# Altium PCB OOZE270323.PcbDoc
Units mil, origin at the board's own origin, x right, y up, seen from the top; angles counter-clockwise.
Board outline 3937.01 x 3937.01 mil, 2 copper layers (Top Layer, Bottom Layer); 41 components, 44 nets, 181 pads, 26 vias.
Unrouted connection lines stored in the file: 13.
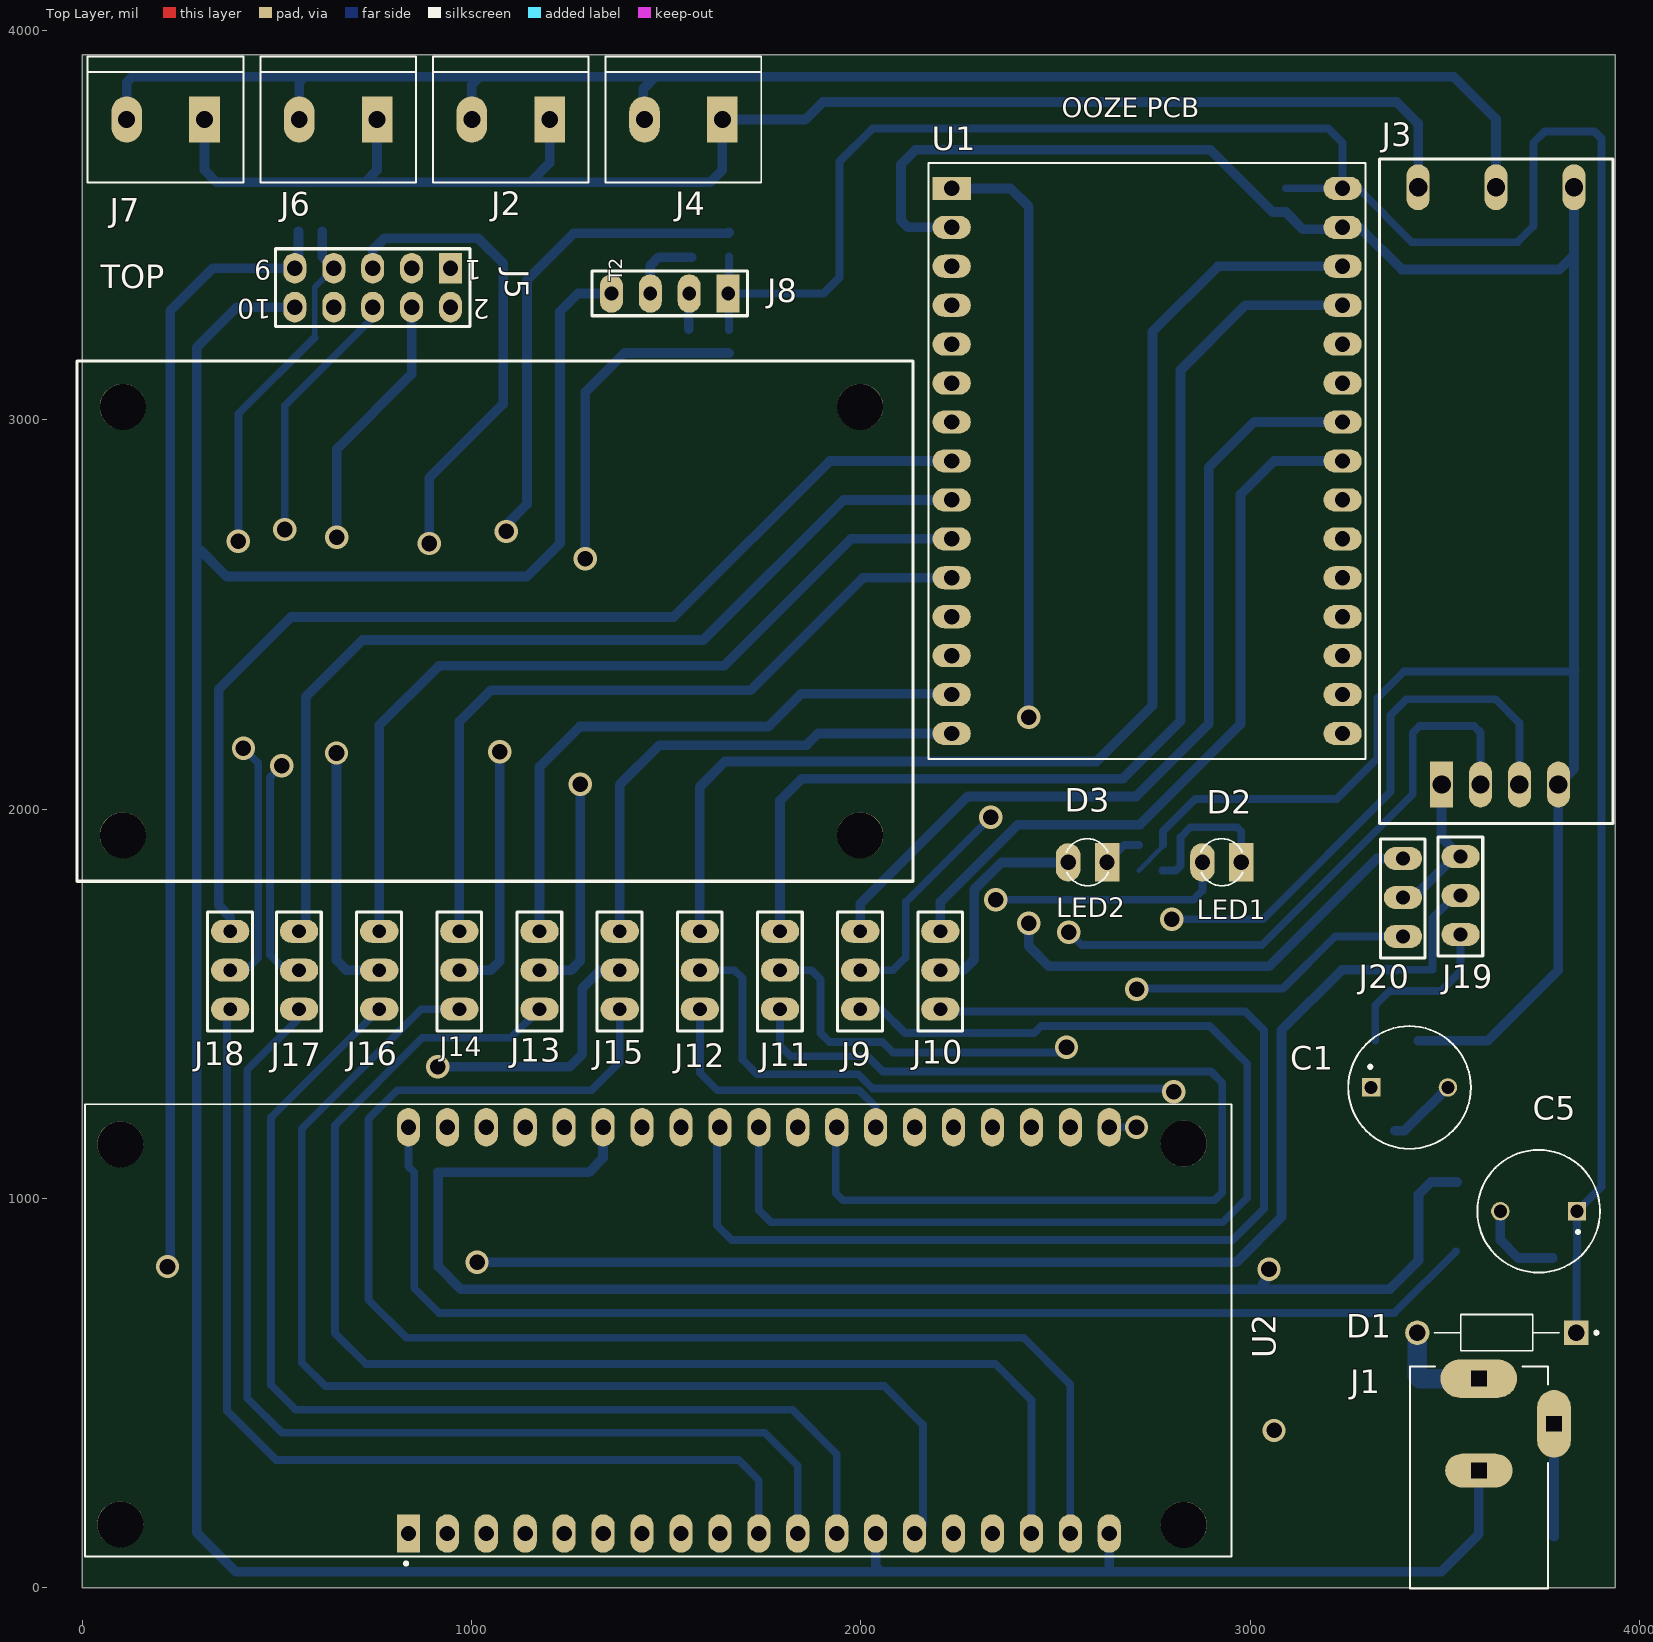
[diagram p0: Top Layer view]
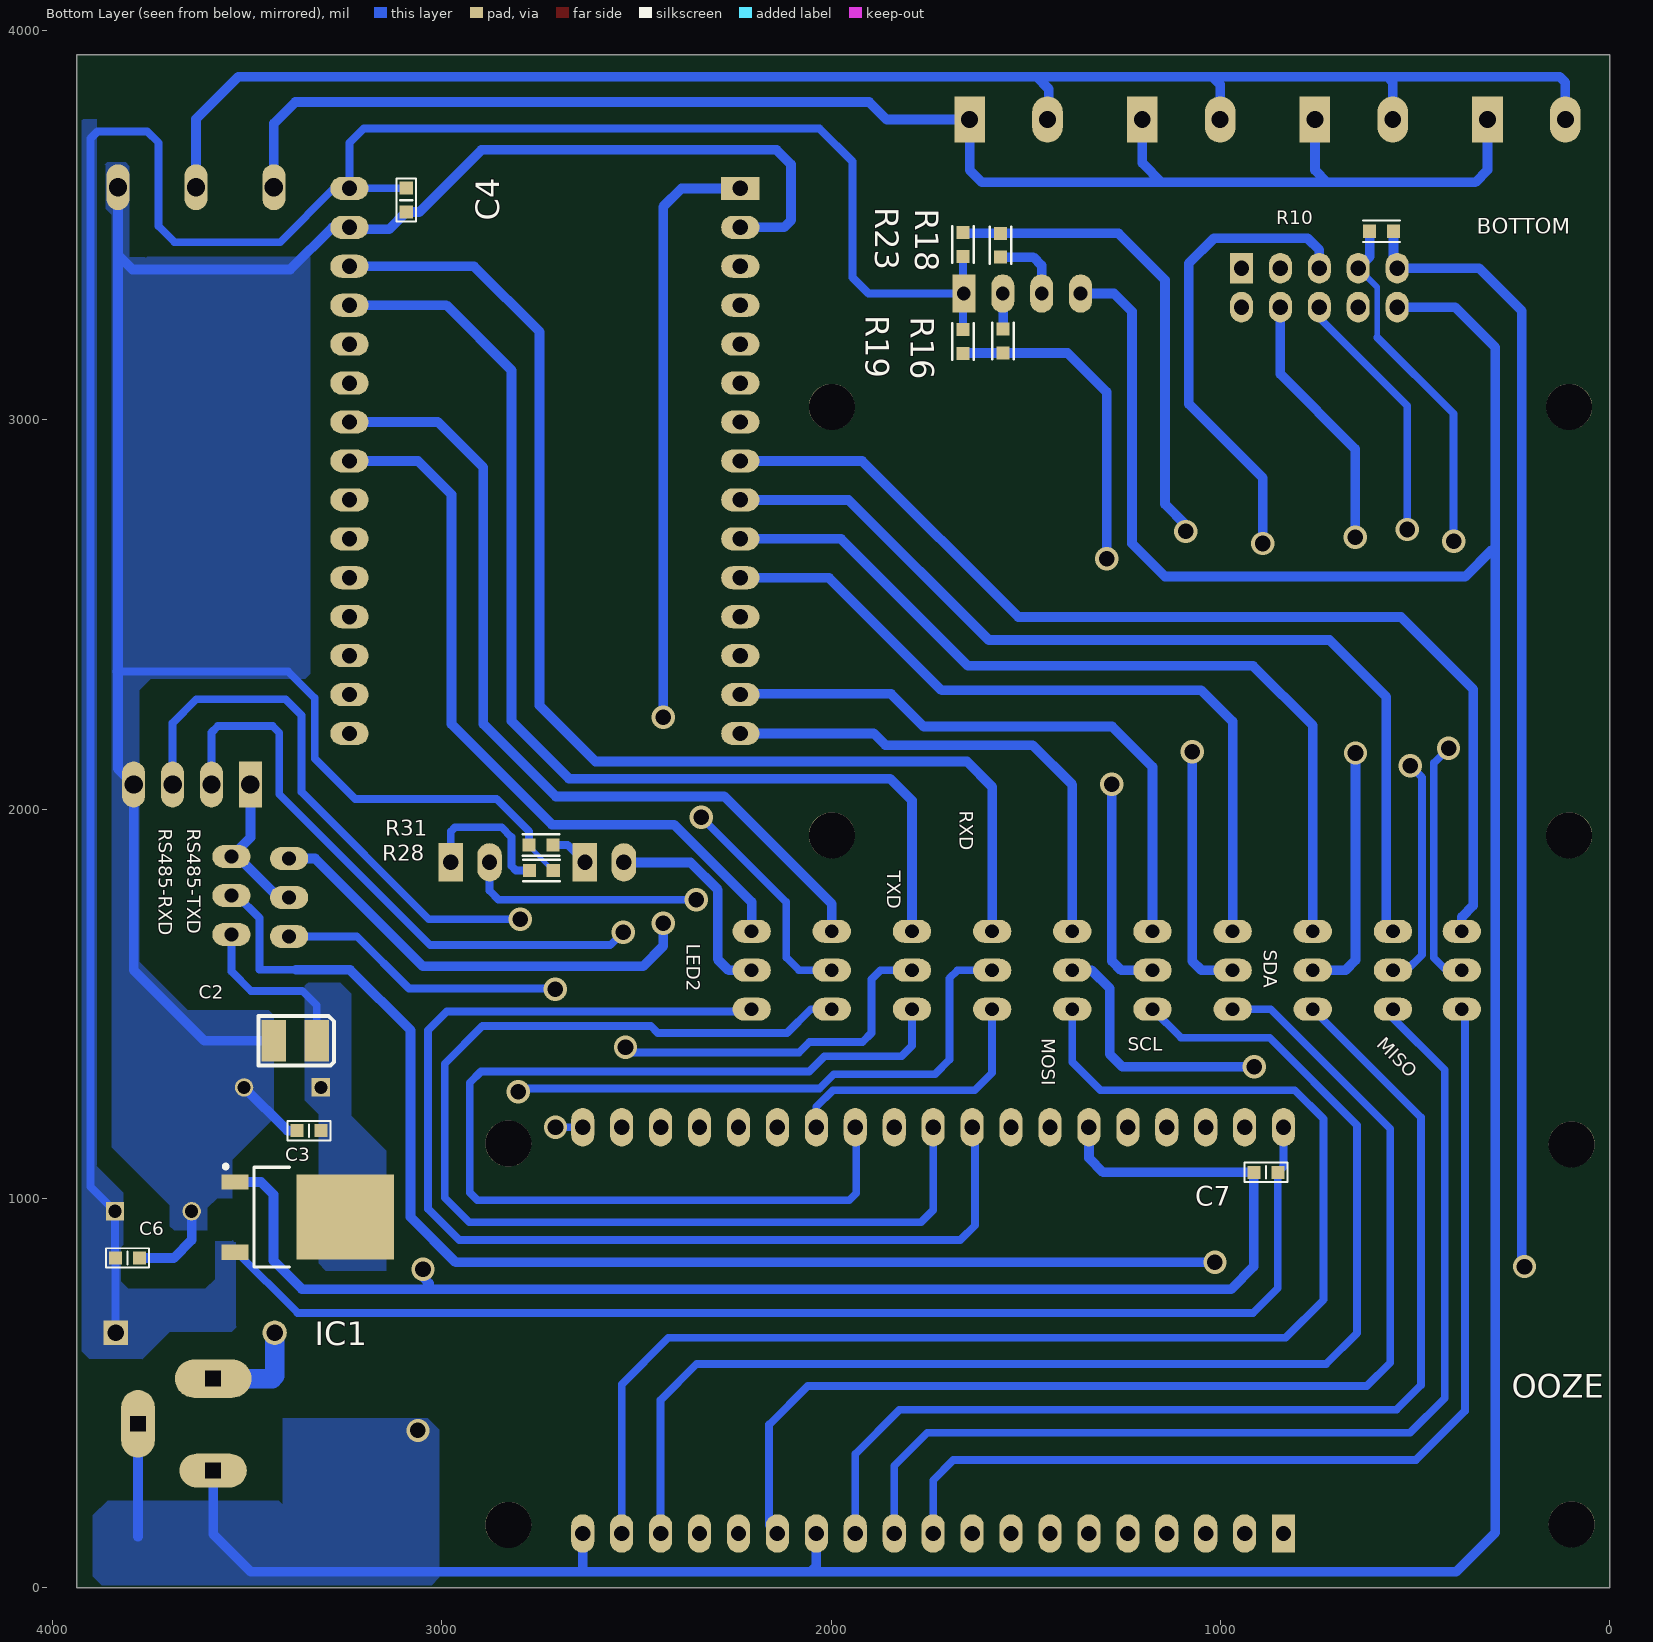
[diagram p1: Bottom Layer view, seen from below]
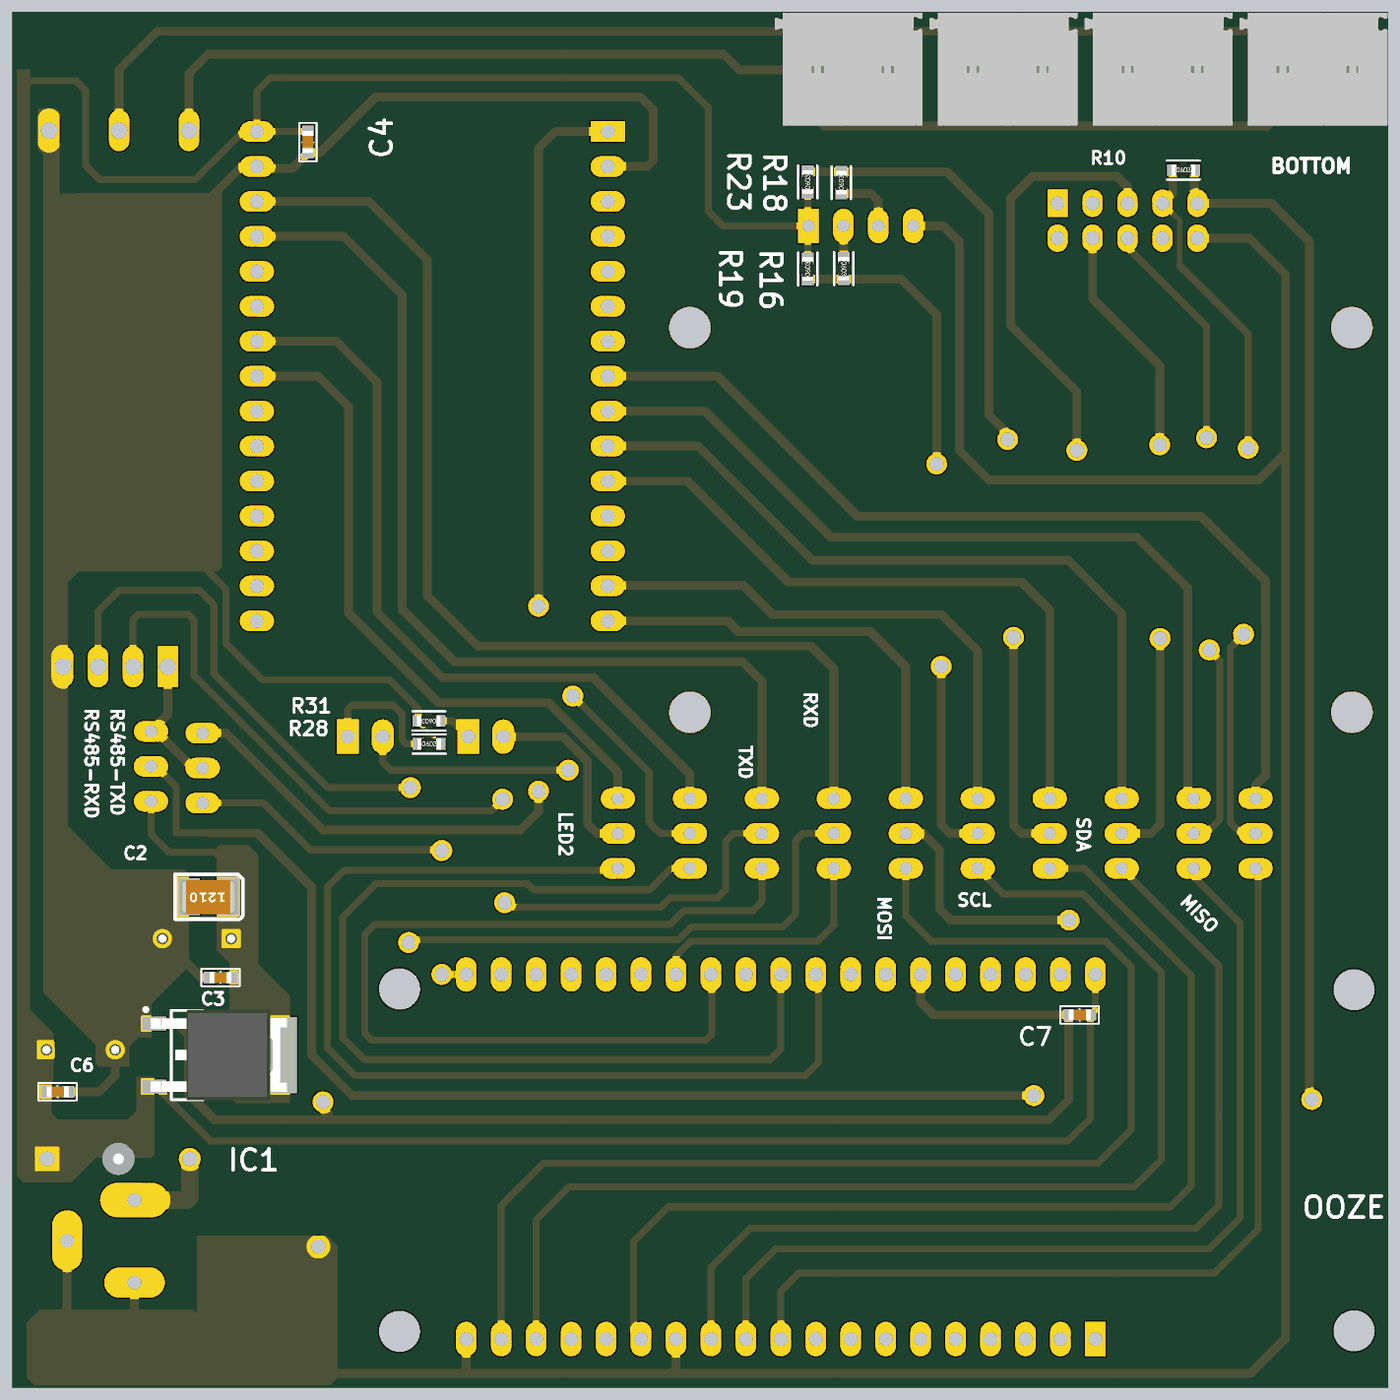
[diagram p2: 3D render of the assembled board from below, using the file's embedded part models]

## Layer stack, top to bottom
Top Solder: solder mask 0.4, Solder Resist, Dk 3.5
Top Layer: signal copper 1.4
Dielectric 1: core 12.6, FR-4, Dk 4.8
Bottom Layer: signal copper 1.4
Bottom Solder: solder mask 0.4, Solder Resist, Dk 3.5

## Board outline
0,0 3937.01,0 3937.01,3937.01 0,3937.01

## Design rules (kind name [scope] priority, off if disabled: settings)
Clearance [All] p1: gap=6 ignorepadtopadclearanceinfootprint=FALSE except(10: Fill-Fill Fill-Poly Fill-Region Poly-Poly Poly-Region Region-Region; 20: Arc-Fill Arc-Poly Arc-Region Track-Fill Track-Poly Track-Region SMDPad-Fill SMDPad-Poly SMDPad-Region Fill-Hole Poly-Hole Region-Hole)
HoleToHoleClearance [All] p1: gap=5 allowstackedmicrovias=TRUE
MinimumSolderMaskSliver [All] p1: minsoldermaskwidth=5
PlaneClearance [All] p1: clearance=200
PlaneConnect [All] p1: planeconnectstyle=Direct reliefexpansion=20 reliefentries=4 reliefconductorwidth=10 reliefairgap=80
PolygonConnect [All] p1: connectstyle=Direct reliefconductorwidth=30 reliefentries=4 polygonreliefangle="90 Angle" airgapwidth=78.74
RoutingVias [All] p1: holewidth=28 width=13 viastyle="Through Hole" minholewidth=20 minwidth=10 maxholewidth=24 maxwidth=13
SilkToSilkClearance [All] p1: silktosilkclearance=5
SilkToSolderMaskClearance [IsPad] p1: minsilkscreentomaskgap=5 clearancetoexposedcopper=TRUE
SolderMaskExpansion [All] p1: expansion=4
Width [All] p1: maxlimit=70 minlimit=6 preferedwidth=10
24 further rules are at their usual default settings.

## Components (designator, comment, footprint, x,y, rotation, side; value= is the part's Value field where it differs from the comment)
C1 "470uF/25V" CAP_through_hole_470mfd 3409,1285 r0 top
C2 "100uF/Tan" Tantalum-1210C 3376,1405 r0 bottom
C3 "100nF" SMD-0603C 3341,1174 r270 bottom
C4 "100nF" SMD-0603C 3091,3564 r180 bottom
C5 "470uF/25V" CAP_through_hole_470mfd 3740.57,967 r180 top
C6 "100nF" SMD-0603C 3807,847 r90 bottom
C7 "100nF" SMD-0603C 883,1067 r270 bottom
D1 "1n5819" "IN5819 SCHOTTKY DIODE" 3632.94,655 r180 top
D2 "LED" "3mm Led1 - single Side" 2977,1863 r180 top
D3 "LED" "3mm Led1 - single Side" 2632,1863 r180 top
IC1 "LM1117DT_3_3_NOPB" LM1117DT_3_3_NOPB 3346,952 r180 bottom
J1 "DC Socket" "DC Socket" 3587,301 r90 top
J2 "5mm TB1" "2PIN TB-Single Side" 1100.66,3771 r180 top
J3 "TTL to RS485" "RS485-TTL Module" 3491.24,1963.14 r0 top
J4 "5mm TB2" "2PIN TB-Single Side" 1544,3771 r180 top
J5 "5x2 Header" HDR2X5 946,3389 r180 top
J6 "5mm TB3" "2PIN TB-Single Side" 657.33,3771 r180 top
J7 "5mm TB4" "2PIN TB-Single Side" 214,3771 r180 top
J8 "JHD-2X16-I2C" "4 pin connector-Single Side" 1659,3324 r180 top
J9 "Header 3" "3 pin connector - Sinle Side" 1998.1,1686 r270 top
J10 "Header 3" "3 pin connector - Sinle Side" 2204,1686 r270 top
J11 "Header 3" "3 pin connector - Sinle Side" 1792.2,1686 r270 top
J12 "Header 3" "3 pin connector - Sinle Side" 1586.3,1686 r270 top
J13 "Header 3" "3 pin connector - Sinle Side" 1174.5,1686 r270 top
J14 "Header 3" "3 pin connector - Sinle Side" 968.6,1686 r270 top
J15 "Header 3" "3 pin connector - Sinle Side" 1380.4,1686 r270 top
J16 "Header 3" "3 pin connector - Sinle Side" 762.7,1686 r270 top
J17 "Header 3" "3 pin connector - Sinle Side" 556.8,1686 r270 top
J18 "Header 3" "3 pin connector - Sinle Side" 379.9,1686 r270 top
J19 "Header 3" "3 pin connector - Sinle Side" 3540,1878 r270 top
J20 "Header 3" "3 pin connector - Sinle Side" 3392,1873 r270 top
R10 "4.7K" SMD-0603-RES 586,3484 r270 bottom
R16 "100E" SMD-0603-RES 1558,3202 r0 bottom
R18 "100E" SMD-0603-RES 1565,3448 r180 bottom
R19 "4.7K" SMD-0603-RES 1661,3201 r180 bottom
R23 "4.7K" SMD-0603-RES 1661,3450 r180 bottom
R28 "1K" SMD-0603-RES 2744,1842 r270 bottom
R31 "1K" SMD-0603-RES 2745,1908 r90 bottom
U1 "ESP32DEVKITV1" "ESP32DEVKITV1- single side" 2233,3594 r0 top
U2 "TTGO_SIM800L" "TTGO_SIM800L-Single Side" 837.76,139.39 r270 top
? "Comment" "Ethernet Module Mounting" 2033.43,2283 r90 top

## Footprints (in the part's own frame and the unit in brackets; to place one, negate y for a bottom-side part, rotate by r counter-clockwise, add the part's x,y. Pads: shape width x height; smd on the part's side, far side on the other; paste and mask are expansions set on the pad)
"2PIN TB-Single Side" [mm]
  rect 2x3 hole 1.1: 1(-2.54,0)
  oval 2x3 hole 1.1: 2(2.54,0)
  silkscreen extent -5.08,-4.1 5.08,4.1, body extent -5.38,-4.14 5.38,4.06, height 8.25
"3 pin connector - Sinle Side" [mm]
  oval 1.5x2.5 hole 0.9: 1(0,0) 2(2.54,0) 3(5.08,0)
  silkscreen extent -1.27,-1.47 6.5,1.45
"3mm Led1 - single Side" [mm]
  rect 1.6x2.5 hole 1: 1(0,0)
  oval 1.6x2.5 hole 1: 2(2.54,0)
  silkscreen extent -0.07,-1.54 2.63,1.52
"4 pin connector-Single Side" [mm]
  rect 1.5x2.5 hole 0.9: 1(0,0)
  oval 1.5x2.5 hole 0.9: 2(2.54,0) 3(5.08,0) 4(7.62,0)
  silkscreen extent -1.27,-1.47 8.89,1.45
CAP_through_hole_470mfd [mm]
  rect 1.2x1.2 hole 0.85: 1(-2.5,0)
  round 1.2 hole 0.85: 2(2.5,0)
  silkscreen extent -4,-4 4,4, body extent -4,-4 4,4, height 11.5
"DC Socket" [mm]
  oval 4.4x2.2 hole 1 square: 1(3.05,-4.9)
  oval 2.2x4.4 hole 1 square: 2(0,0)
  oval 2.5x5 hole 1 square: 3(6,0)
  silkscreen extent -7.7,-4.5 6.8,4.5
"ESP32DEVKITV1- single side" [mm]
  rect 2.5x1.508 hole 1: 1(0,0)
  oval 2.5x1.508 hole 1: 2(0,-2.54) 3(0,-5.08) 4(0,-7.62) 5(0,-10.16) 6(0,-12.7) 7(0,-15.24) 8(0,-17.78) 9(0,-20.32) 10(0,-22.86) 11(0,-25.4) 12(0,-27.94) 13(0,-30.48) 14(0,-33.02) 15(0,-35.56) 16(25.5,-35.56) 17(25.5,-33.02) 19(25.5,-27.94) 20(25.5,-25.4) 21(25.5,-22.86) 22(25.5,-20.32) 23(25.5,-17.78) 24(25.5,-15.24) 25(25.5,-12.7) 26(25.5,-10.16) 27(25.5,-7.62) 28(25.5,-5.08) 29(25.5,-2.54) 30(25.5,0)
  oval 2.5x1.508 hole 1 mask+0.102: 18(25.5,-30.48)
  silkscreen extent -1.5,-37.23 27,1.67
"Ethernet Module Mounting" [mm]
  round 3 hole 3: MH(-8.9,49) MH(-8.9,0.9) MH(19.05,49) MH(19.05,0.9)
  silkscreen extent -11.9,-2.54 22.05,52
HDR2X5 [mm] "Connector; Header; 5x2 Position"
  rect 1.5x2 hole 1: 1(0,0)
  oval 1.5x2 hole 1: 2(0,2.54) 3(2.54,0) 4(2.54,2.54) 5(5.08,0) 6(5.08,2.54) 7(7.62,0) 8(7.62,2.54) 9(10.16,0) 10(10.16,2.54)
  silkscreen extent -1.27,-1.27 11.43,3.81
"IN5819 SCHOTTKY DIODE" [mm]
  round 1.59 hole 1.06: A(5.18,0)
  rect 1.59x1.59 hole 1.06: C(-5.18,0)
  silkscreen extent -6.6,-1.17 4.07,1.17, body extent -1.17,-1.17 1.17,1.17, height 27.72
LM1117DT_3_3_NOPB [mm]
  rect 1.75x1 smd: 1(-4.7,2.285) 3(-4.7,-2.285)
  rect 6.35x5.55 smd: 4(2.5,0)
  silkscreen extent -5.43,-3.25 -1.15,3.42, body extent -4.95,-3.29 4.95,3.29, height 2.47
"RS485-TTL Module" [mm]
  rect 1.5x3 hole 1.2: 1(0,2.54)
  oval 1.5x3 hole 1.2: 2(2.54,2.54) 3(5.08,2.54) 4(7.62,2.54) 5(-1.53,41.5) 6(3.55,41.5) 7(8.64,41.5)
  silkscreen extent -4.05,0 11.18,43.33
SMD-0603-RES [mm]
  rect 0.85x0.85 smd: 1(0,0.775) 2(0,-0.775)
  silkscreen extent -0.7,-1.2 0.7,1.2, body extent -0.4,-0.85 0.4,0.85, height 0.56
SMD-0603C [mm]
  rect 0.85x0.85 smd: 1(0,0.775) 2(0,-0.775)
  silkscreen extent -0.64,-1.4 0.64,1.4, body extent -0.4,-0.8 0.4,0.8, height 0.9
Tantalum-1210C [mm]
  rect 1.6x2.7 smd: 1(-1.4,0) 2(1.4,0)
  silkscreen extent -2.51,-1.63 2.41,1.63, body extent -2,-1.22 2,1.27, height 1.7
"TTGO_SIM800L-Single Side" [mm]
  rect 2.508x1.508 hole 1: 1(0,0)
  oval 2.508x1.508 hole 1: 2(0,2.54) 3(0,5.08) 4(0,7.62) 5(0,10.16) 6(0,12.7) 7(0,15.24) 8(0,17.78) 9(0,20.32) 10(0,22.86) 11(0,25.4) 12(0,27.94) 13(0,30.48) 14(0,33.02) 15(0,35.56) 16(0,38.1) 17(0,40.64) 18(0,43.18) 19(0,45.72) 20(-26.5,45.72) 21(-26.5,43.18) 22(-26.5,40.64) 23(-26.5,38.1) 24(-26.5,35.56) 25(-26.5,33.02) 26(-26.5,30.48) 27(-26.5,27.94) 28(-26.5,25.4) 29(-26.5,22.86) 30(-26.5,20.32) 31(-26.5,17.78) 32(-26.5,15.24) 33(-26.5,12.7) 34(-26.5,10.16) 35(-26.5,7.62) 36(-26.5,5.08) 37(-26.5,2.54) 38(-26.5,0)
  round 3 hole 3 unplated: ""(-25.44,50.57) ""(-25.39,-18.79) ""(-0.6,-18.79) ""(-0.56,50.57)
  silkscreen extent -28,-21.09 2.06,53.69

## Part data
C1 C2 C5: library part CAP
C3 C4 C6 C7: library part "CAP NP"
D1: library part "DIODE SCHOTTKY"
IC1: "Space saving 800-mA low-dropout linear regulator with internal current limit", DevicesInPackage=1, Manufacturer_Name="Texas Instruments", Manufacturer_Part_Number=LM1117DT-3.3/NOPB, Mouser Part Number=926-LM1117DT-3.3NOPB, Datasheet Link=https://datasheet.datasheetarchive.com/originals/distributors/Datasheets-SFU2/DSASFU100036103.pdf, DeviceDesignator=A, DeviceNumbering=Alpha, DevicesInView=1, Height="2.38 mm", IsHeterogeneous=False, OriginalSymbolOrigin=(0,0), PackageName=LM1117DT_3_3_NOPB
J1: library part CON3
J2 J4 J6 J7: library part CON2
J3: library part CON7
J5: library part CON10AP_0
J8: library part CON4
J9 J10 J11 J12 J13 J14 J15 J16 J17 J18 J19 J20: "Header, 3-Pin", LatestRevisionDate=17-Jul-2002, LatestRevisionNote="Re-released for DXP Platform.", Publisher="Altium Limited"
R10 R16 R18 R19 R23 R28 R31: library part RESISTOR

## Via types
v1: diameter 60, hole 40, Top Layer to Bottom Layer, 26 vias

## Nets (pads, with @x,y where several pads share a name; then routed paths per layer and width w, separated by ;. In a path a pad name is that pad's centre, name@x,y a point inside that pad or via, vN(x,y) a via of type N, cw(c..) or ccw(c..) an arc to the next point about the centre after c; other vN are vias at no path point)
+3.3V1: J20.1 U1.1 | length 2684.7
  Bottom Layer w25: U1.1 2384,3594 2431,3547 v1(2431,2236) ; v1(2431,1707) 2431,1648 2483,1596 3048,1596 3325,1873 J20.1
+3.3V2: J20.3 U2.20 | length 805.4
  Bottom Layer w20: U2.20 v1(2707.7,1182.7) ; v1@2712,1539 3084,1539 3218,1673 J20.3
  other v1: 2708,1537
+3.3V_ETH: J5.9 J19.2 R10.1 | length 6196.7
  Bottom Layer w20: 3374,1587 3468,1587 3468,1720 3526,1778 J19.2
  Bottom Layer w25: v1(219,825) 226,832 226,3279 336,3389 J5.9 555.49,3398.49 R10.1 ; v1(1014,836) 2964,836 3080,952 3080,1432 3235,1587 3374,1587
+3.3V_EXT: C1.1 C2.1 C3.1 IC1.4 J19.3 | length 441.1
  Bottom Layer w20: C2.1 3320.88,1495.88 3358,1533 3490,1533 3540,1583 J19.3
+3.3VDC: J3.1 J19.1 J20.2 | length 396.8
  Bottom Layer w25: J20.2 3419,1773 3524,1878 J19.1 3491.24,1926.76 J3.1
A+: J2.1 J3.5 J4.1 J6.1 J7.1 | length 3964.8
  Bottom Layer w25: J7.1 314,3641 345.42,3609.58 726,3609.58 ; J6.1 757.33,3640.91 726,3609.58 ; J2.1 1200.66,3659.25 1151,3609.58 ; J3.5 3431,3761 3376,3816 1902,3816 1857,3771 J4.1 1644,3641 1612.58,3609.58 1151,3609.58 ; 726,3609.58 1151,3609.58
B-: J2.2 J3.6 J4.2 J6.2 J7.2 | length 4195.3
  Bottom Layer w25: J7.2 114,3866 129,3881 571,3881 ; J6.2 557.33,3867.33 571,3881 ; J2.2 1000.66,3860.66 1021,3881 ; J4.2@1441,3771 1441,3850 1472,3881 ; J3.6 3631,3772 3522,3881 1472,3881 ; 571,3881 1021,3881 ; 1021,3881 1472,3881
CS: J5.7 J18.2 R10.2 | length 1548.8
  Bottom Layer w15: 597,3211 597,3340 J5.7
  Bottom Layer w20: J18.2 420,1586 452,1618 452,2118 v1(414,2156) ; v1(401,2688) 401,3015 597,3211
  Bottom Layer w25: R10.2 616.51,3418.49 J5.7
CS1: J18.1 U1.8 | length 2747
  Bottom Layer w25: J18.1 379.9,1723.1 350.9,1752.1 350.9,2307.9 536,2493 1519,2493 1920,2894 U1.8@2212,2894 ; U1.8@2215.5,2890.5 U1.8@2222,2897
CS2: J18.3 U2.10 | length 2611.5
  Bottom Layer w20: J18.3 372,1478.1 372,454 498,328 1686,328 1737.76,276.24 U2.10
GND: C1.2 C2.2 C3.2 C4.2 C5.2 C6.2 C7.2 IC1.1 J1.1 J1.2 J3.4 J3.7 J5.10 J8.4 R28.1 R31.1 U1.2 U1.29 U2.13 U2.19 U2.33 | length 19345.1
  Bottom Layer w12: R28.1 2775.51,1904.02 R31.1
  Bottom Layer w20: R31.1 2775.51,1942.51 2859,2026 3222,2026 3326,2130 3326,2285 3394,2353 3831.39,2353 3835,2353
  Bottom Layer w25: 302,2666 371,2597 1142,2597 1227,2682 1227,3278 1273,3324 J8.4 ; J5.10 397,3289 294,3186 294,142 395,41 2053,41 ; C7.2 1301,1067 1337.76,1103.76 U2.33 ; C7.2@914.49,1067 914.49,824.51 972,767 3359,767 3432,840 3432,1010 3463.96,1041.96 IC1.1 ; U2.13 2037.76,56.24 2053,41 ; U1.2 2121,3494 2103,3512 2103,3656 2140,3693 2898,3693 3057.51,3533.49 C4.2 3135.49,3489 3231.94,3489 U1.29 3281,3494 3389,3386 3794,3386 3831.39,3423.39 ; U2.19 2637.76,43.76 2635,41 ; 3032,782 3048,798 v1(3048,818) ; C3.2 3396.43,1174 C1.2 ; C2.2 3610,1405 3791.24,1586.24 J3.4 3831.39,2103.3 3831.39,2353 3831.39,3423.39 ; J1.2 3587,138 3490,41 2635,41 ; C5.2 3642.15,892.85 3688,847 C6.2 ; J1.1@3770.91,376.53 J1.1@3770.91,467.08 ; 3779.91,131.09 J1.1 ; J3.7 3831.39,3423.39 ; 2053,41 2635,41
  other v1: 3061,404
LED1: D2.2 J9.2 | length 1194.4
  Bottom Layer w20: J9.2 2082,1586 2115,1619 2115,1761 v1(2333,1979) ; v1(2346,1767) 2854,1767 2877,1790 D2.2
LED1_1: J9.1 U1.24 | length 2186.7
  Bottom Layer w25: J9.1 1998.1,1756.1 2274,2032 2707,2032 2893,2218 2893,2877 3010,2994 U1.24@3215.94,2994
LED1_2: J10.1 U1.23 | length 1901.9
  Bottom Layer w25: J10.1 2204,1761 2403,1960 2717,1960 2975,2218 2975,2808 3061,2894 U1.23@3215.94,2894
LED2: D3.2 J10.2 | length 547.6
  Bottom Layer w25: J10.2 2263,1586 2291,1614 2291,1793 2361,1863 D3.2
LED2_1: J9.3 U2.29 | length 2916.5
  Bottom Layer w20: U2.29 1737.76,970.24 1769,939 2929,939 2992,1002 2992,1346 2895,1443 2463,1443 2445,1425 2113,1425 2052,1486 J9.3
LED2_2: J10.3 U2.30 | length 3021.2
  Bottom Layer w20: U2.30 1630,1174.94 1630,931 1668,893 2955,893 3035,973 3035,1432 2987,1480 2210,1480 J10.3
MISO: J5.4 J16.2 | length 1323
  Bottom Layer w25: v1(653,2144) 653,1612 679,1586 J16.2 ; v1(654,2698) 654,2925 846,3117 J5.4
MISO1: J16.1 U1.10 | length 2176.5
  Bottom Layer w25: J16.1 762.7,2214.7 916,2368 1648,2368 1974,2694 U1.10@2212,2694
MISO2: J16.3 U2.12 | length 2810.9
  Bottom Layer w20: J16.3 485,1208.3 485,520 548,457 1824,457 1937.76,343.24 U2.12
MOSI: J5.5 J15.2 | length 1888.8
  Bottom Layer w25: J5.5 746,3436 776,3466 1017,3466 1081,3402 1081,3040 891,2850 v1(891,2682) ; v1(913,1338) 1252,1338 1284,1370 1284,1539 1331,1586 J15.2
MOSI1: J15.1 U1.15 | length 1262.5
  Bottom Layer w25: J15.1 1380.4,2062.4 1482,2164 1860,2164 1890,2194 U1.15@2212,2194
MOSI2: J15.3 U2.18 | length 3581.4
  Bottom Layer w20: J15.3 1380.4,1350.4 1308,1278 809,1278 735,1204 735,740 833,642 2418,642 2537.76,522.24 U2.18
NetD1_A: D1.A J1.3 | length 271.8
  Bottom Layer w50: D1.A 3429,544 3435.78,537.22 J1.3
NetD2_1: D2.1 R28.2 | length 375.4
  Bottom Layer w20: R28.2 2809,1842 2821,1854 2821,1928 2846,1953 2966,1953 2977,1942 D2.1
NetD3_1: D3.1 R31.2 | length 101.1
  Bottom Layer w20: D3.1 2677,1908 R31.2
NetJ8_2: J8.2 R16.2 | length 91.9
  Bottom Layer w25: R16.2 1558,3323 J8.2
NetJ8_3: J8.3 R18.2 | length 186.9
  Bottom Layer w25: J8.3 1459,3396 1480.49,3417.49 R18.2
RS485-RXD: J3.3 J12.2 | length 2894
  Bottom Layer w20: J12.2 1675,1586 1696,1565 1696,1356 1733,1319 1993,1319 2030,1282 2795,1282 v1(2803,1274) ; v1(2798,1717) 3033,1717 3360,2044 3360,2241 3401,2282 3630,2282 3691.24,2220.76 J3.3
RS485-RXD1: J12.1 U1.28 | length 3117
  Bottom Layer w25: J12.1 1586.3,2057.3 1651,2122 2605,2122 2749,2266 2749,3226 2917,3394 U1.28@3215.94,3394
RS485-RXD2: J12.3 U2.26 | length 703.5
  Bottom Layer w20: J12.3 1586.3,1322.7 1631,1278 1995,1278 2037.76,1235.24 U2.26
RS485-TXD: J3.2 J11.2 | length 2446.4
  Bottom Layer w20: J11.2 1873,1586 1896,1563 1896,1425 1919,1402 2055,1402 2082,1375 2515,1375 v1(2528,1388) ; v1(2534,1684) 2567.5,1650.5 3029.5,1650.5 3417,2038 3417,2196 3434,2213 3575,2213 3591.24,2196.76 J3.2
RS485-TXD1: J11.1 U1.27 | length 2814.5
  Bottom Layer w25: J11.1 1792.2,2022.2 1848,2078 2673,2078 2821,2226 2821,3127 2988,3294 U1.27@3215.94,3294
RS485-TXD2: J11.3 U2.27 | length 2730.9
  Bottom Layer w20: J11.3 1792.2,1391.8 1819,1365 2017,1365 2056,1326 2899,1326 2928,1297 2928,1015 2908,995 1953,995 1935,1013 1935,1179.94 U2.27
SCK: J5.6 J17.2 | length 1253.4
  Bottom Layer w20: v1(512,2111) 482,2081 482,1626 522,1586 J17.2 ; v1(520,2718) 520,3036 746,3262 J5.6
SCK1: J17.1 U1.9 | length 2456.7
  Bottom Layer w25: J17.1 574,1703.2 574,2288 720,2434 1595,2434 1955,2794 U1.9@2212,2794
SCK2: J17.3 U2.11 | length 2713.6
  Bottom Layer w20: J17.3 556.8,1462.8 424,1330 424,487 513,398 1753,398 1837.76,313.24 U2.11
SCL: J13.2 R16.1 R19.2 | length 1407.5
  Bottom Layer w25: J13.2 1255,1586 1279,1610 v1(1279,2064) ; v1(1292,2643) 1292,3071 1392.49,3171.49 R16.1 1660,3171.49 R19.2
SCL1: J13.1 U1.14 | length 1538.5
  Bottom Layer w25: J13.1 1174.5,2108.5 1278,2212 1762,2212 1846,2296 2210,2296 U1.14@2212,2294
SCL2: J13.3 U2.17 | length 3385.7
  Bottom Layer w20: J13.3 1101,1412.5 873.5,1412.5 649,1188 649,654 728,575 2345,575 2437.76,482.24 U2.17
SDA: J14.2 R18.1 R23.1 | length 1888.2
  Bottom Layer w25: J14.2 1049,1586 1072,1609 v1(1072,2147) ; v1(1089,2713) 1089,2730 1142,2783 1142,3359 1261.51,3478.51 R18.1 1659,3478.51 R23.1
SDA1: J14.1 U1.11 | length 1935
  Bottom Layer w25: J14.1 968.6,2224.6 1049,2305 1716,2305 2005,2594 U1.11@2212,2594
SDA2: J14.3 U2.14 | length 3082
  Bottom Layer w20: J14.3 871,1486 564,1179 564,578 624,518 2060,518 2159,419 2159,160.63 U2.14
VDD: C4.1 C5.1 C6.1 C7.1 D1.C IC1.3 J8.1 R19.1 R23.2 U1.30 U2.38 | length 9651.2
  Bottom Layer w20: U2.38 837.76,1081.72 C7.1 852.49,769.51 916,706 3370,706 IC1.3@3528.54,864.54 ; R19.1@1661,3230.51 R19.1 1661,3322 J8.1 ; R23.2 1661,3326 J8.1 ; C4.1 3236.43,3594.51 U1.30 ; D1.C 3837.51,655.64 C6.1 3839,848.49 C5.1 3902,1030 3902,3722 3884,3740 3756,3740 3727,3711 3727,3497 3686,3456 3415,3456 3277,3594 U1.30 ; J8.1 1904,3324 1945,3365 1945,3663 2030,3748 3200,3748 3236.94,3711.06 U1.30
pads on no net: ?.MH J5.1 J5.2 J5.3 J5.8 U1.3 U1.4 U1.5 U1.6 U1.7 U1.12 U1.13 U1.16 U1.17 U1.18 U1.19 U1.20 U1.21 U1.22 U1.25 U1.26 U2. U2.1 U2.2 U2.3 U2.4 U2.5 U2.6 U2.7 U2.8 U2.9 U2.15 U2.16 U2.21 U2.22 U2.23 U2.24 U2.25 U2.28 U2.31 U2.32 U2.34 U2.35 U2.36 U2.37

## Polygon pours and split planes (outlines as drawn)
GND on Bottom Layer "GND" (solid, remove dead copper, pour order 8): 3408,213 3419,224 3858,224 3896,186 3896,30 3873,7 3026,7 3006,27 3006,406 3036,436 3408,436
+3.3V_EXT on Bottom Layer "+3.3V_EXT" (solid, remove dead copper, pour order 6): 3346,1542 3346,1551 3343,1554 3261,1554 3232,1525 3232,1212 3143,1123 3143,814 3148.7,808.3 3291.3,808.3 3316,833 3316,1216 3352,1252 3352,1546 3346,1552 3346,1538
GND on Bottom Layer "GND" (solid, remove dead copper, pour order 4): 3756,3419 3760,3415 3762,3417 3802,3417 3802,3651 3812,3661 3859,3661 3865,3655 3863,3653 3863,3542 3848,3527 3848,1132 3698,982 3698,929 3687,918 3602,918 3602,976 3577,1001 3538,1001 3538,1099 3431,1206 3431,1470 3444,1483 3652,1483 3777,1608 3777,2305 3747,2335 3350,2335 3337,2348 3337,3419
VDD on Bottom Layer "VDD" (solid, remove dead copper, pour order 2): 3537,892 3539,890 3582,890 3582,793 3607,768 3805,768 3824,787 3824,875 3818,881 3818,1015 3887,1084 3886,1085 3886,3772 3920,3772 3922,3774 3924,3772 3924,607 3905,588 3770,588 3769,587 3698,658 3539,658 3527,670 3529,672 3529,888 3533,888

## Silkscreen, mask and mechanical layers (free items; w line width, h text height)
Top Overlay:
  text "OOZE PCB" at 2516,3777 h50
  text "T2" at 1387,3356 h35 r90
  text "TOP" at 47,3338 h60
  text "LED2" at 2501,1722 h50
  text "LED1" at 2863,1717 h50
Bottom Overlay:
  text "BOTTOM" at 342,3477 h40
  text "RXD" at 1670,1996 h35 r90
  text "RS485-TXD" at 3653,1949 h35 r90
  text "RS485-RXD" at 3727,1949 h35 r90
  text "TXD" at 1856,1842 h35 r90
  text "LED2" at 2371,1654 h35 r90
  text "SDA" at 889,1638 h35 r90
  text "MOSI" at 1459,1411 h35 r90
  text "MISO" at 601,1393 h35 r45
  text "SCL" at 1238,1379 h35
  text "OOZE" at 252,488 h60
Mechanical 1:
  the board outline again, w5

## Text inside footprints (layer, text, board x,y; h text height)
J5: Top Overlay "2" at 1046,3309 h50 r180; Top Overlay "1" at 1026,3409 h50 r180; Top Overlay "9" at 486,3409 h50 r180; Top Overlay "10" at 486,3309 h50 r180